# Altium PCB Driver_S_Comm.PcbDoc (part 3 of 5)
Units mm, origin at the board's own origin, x right, y up, seen from the top; angles counter-clockwise.
Board outline 200.2 x 290.2 mm, 2 copper layers (Top Layer, Bottom Layer), stack 1.371 mm thick; 518 components, 197 nets, 1403 pads, 323 vias.
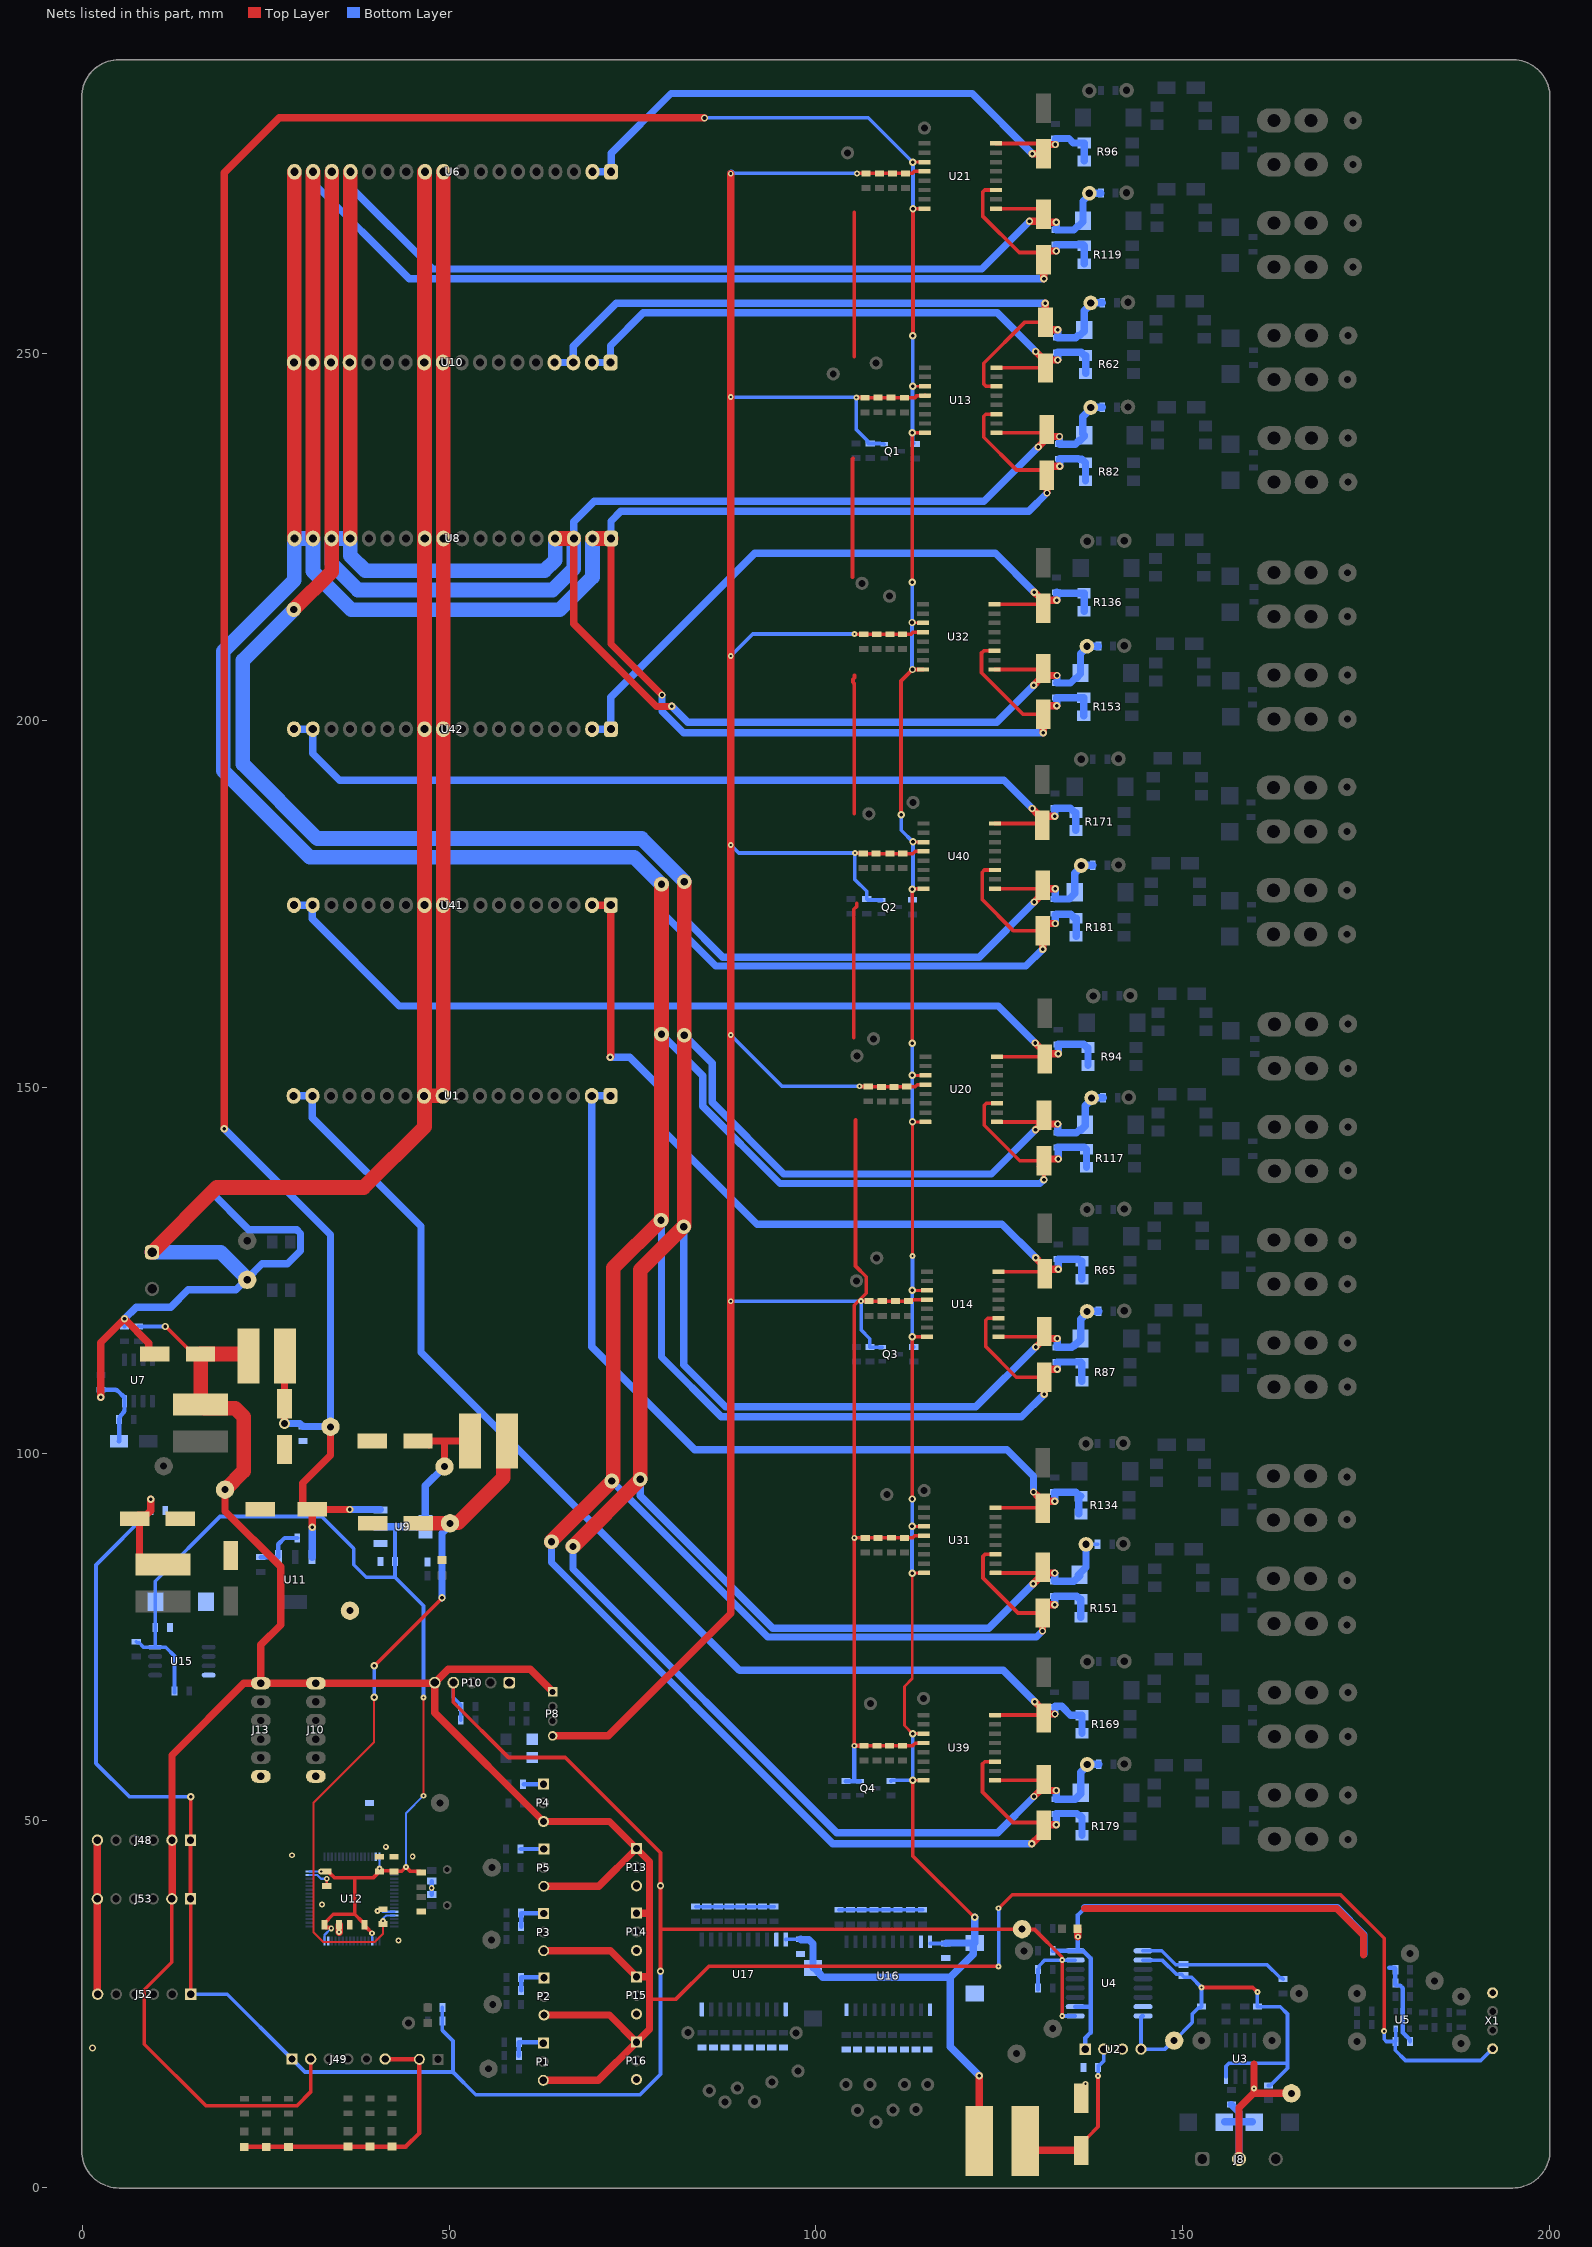
[diagram p2: the nets of this part, all layers, seen from the top]

## Via types
v1: diameter 1, hole 0.5, Top Layer to Bottom Layer, tented both sides, 118 vias
v2: diameter 0.8, hole 0.3, Top Layer to Bottom Layer, 112 vias
v3: diameter 0.8, hole 0.3, Top Layer to Bottom Layer, tented both sides, 64 vias
v4: diameter 2, hole 1, Top Layer to Bottom Layer, tented both sides, 11 vias
v5: diameter 1, hole 0.5, Top Layer to Bottom Layer, 9 vias
v6: diameter 0.8, hole 0.4, Top Layer to Bottom Layer, 5 vias
v7: diameter 0.8, hole 0.4, Top Layer to Bottom Layer, tented both sides, 2 vias
v8: diameter 0.7, hole 0.3, Top Layer to Bottom Layer, tented both sides, 1 vias
v9: diameter 1.5, hole 1, Top Layer to Bottom Layer, tented both sides, 1 vias

## Nets (pads, with @x,y where several pads share a name; then routed paths per layer and width w, separated by ;. In a path a pad name is that pad's centre, name@x,y a point inside that pad or via, vN(x,y) a via of type N, cw(c..) or ccw(c..) an arc to the next point about the centre after c; other vN are vias at no path point) (continued)
GND_-24V_2: (continued)
  Bottom Layer w2: v4(28.825,215.125) 21.875,208.175 21.875,194.075 32.05,183.9 76.275,183.9 82.075,178.1 v4(82.075,178) ; U8.4@64.46,224.815 64.46,221.86 63,220.4 38.6,220.4 36.52,222.48 U8.15@36.52,224.815 U8.16@33.98,224.815 33.98,221.353 37.533,217.8 64.1,217.8 67,220.7 U8.3@67,224.815